# Altium PCB PWM_CONTROLLER_nverter_540VDC_V2.PcbDoc (part 1 of 2)
Units mm, origin at the board's own origin, x right, y up, seen from the top; angles counter-clockwise.
Board outline 210 x 60 mm, 2 copper layers (Top Layer, Bottom Layer), stack 2.071 mm thick; 245 components, 120 nets, 586 pads, 102 vias.
Unrouted connection lines stored in the file: 1.
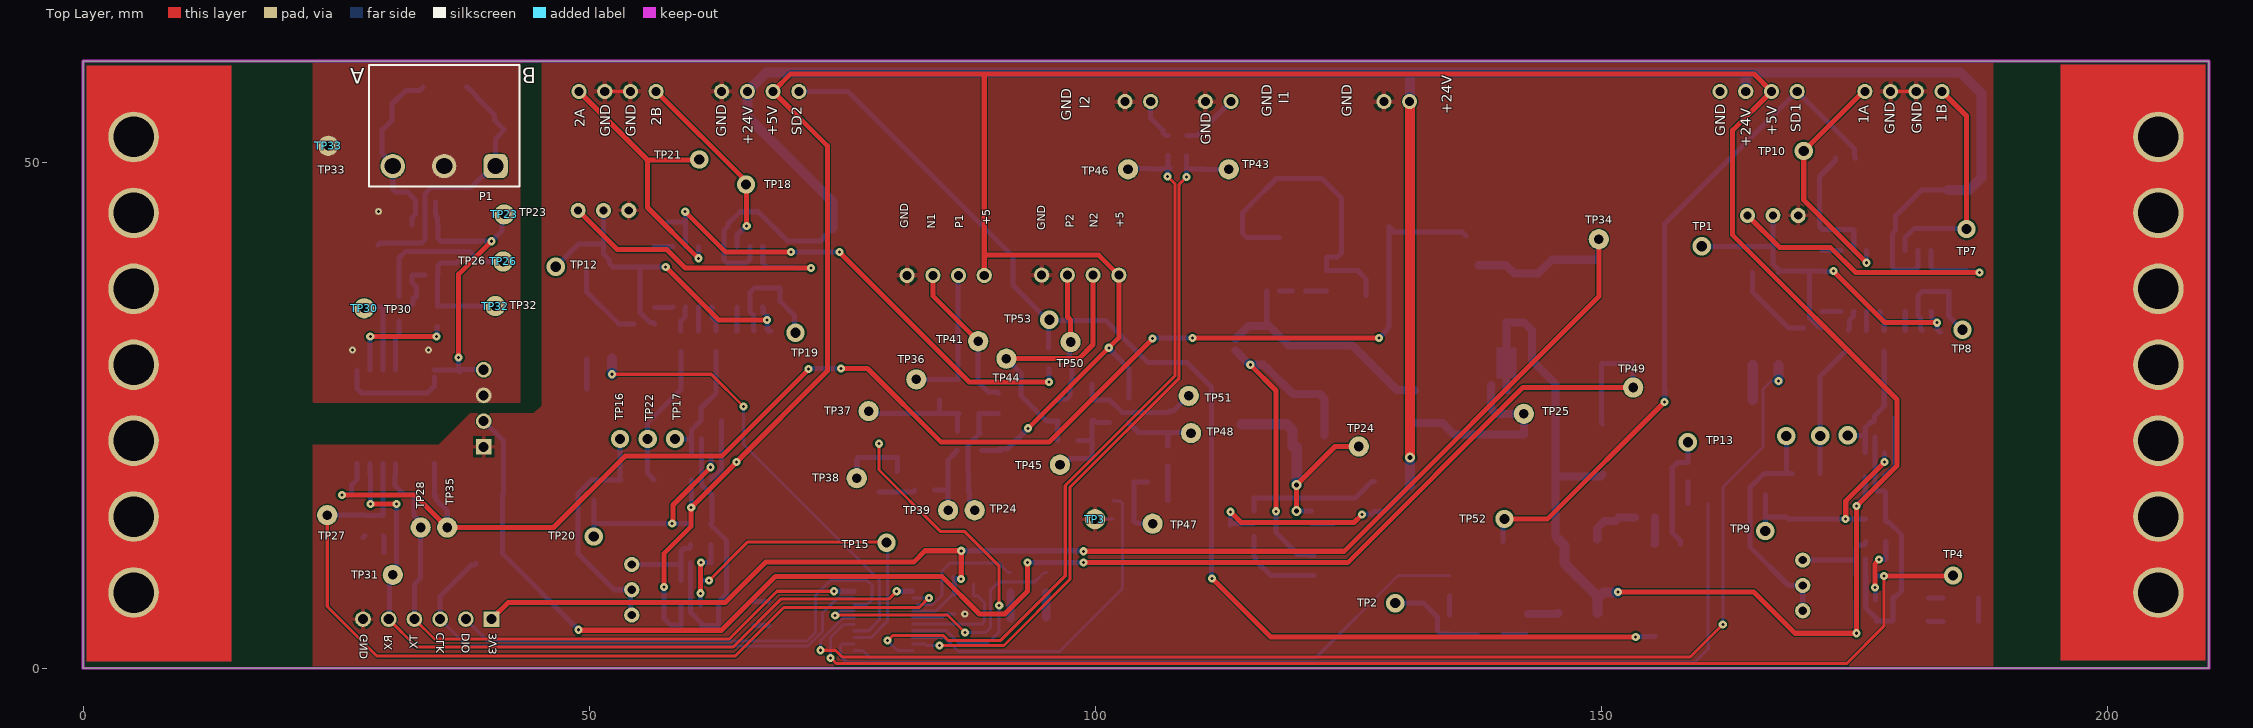
[diagram p0: Top Layer view]
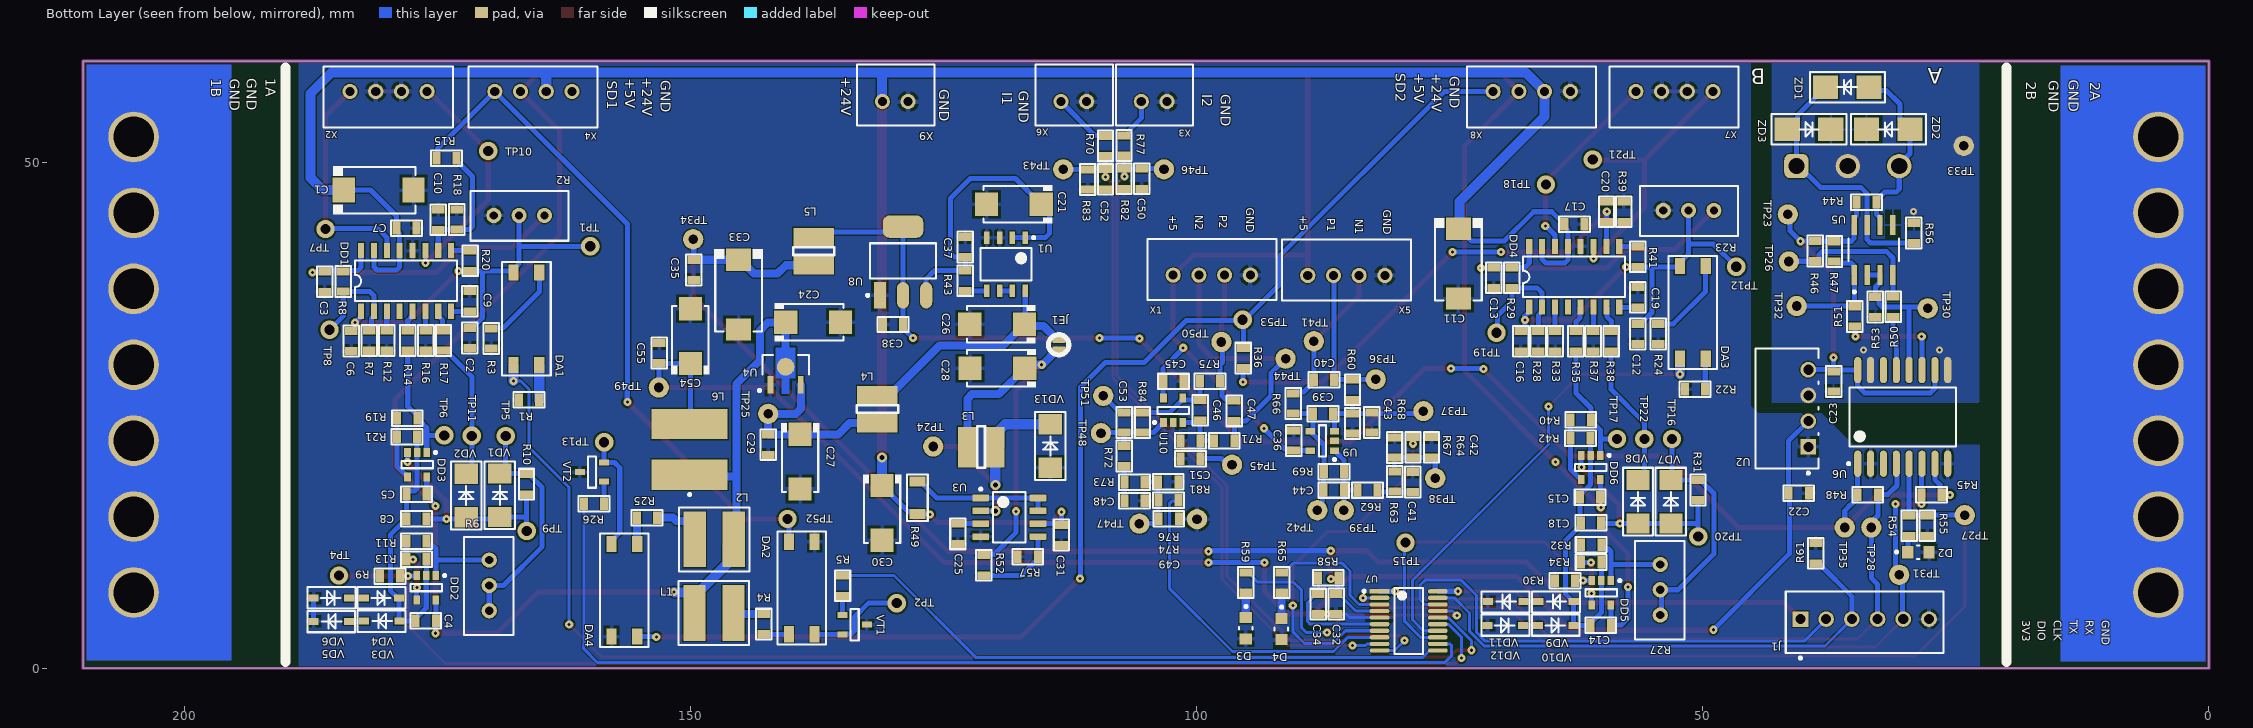
[diagram p1: Bottom Layer view, seen from below]
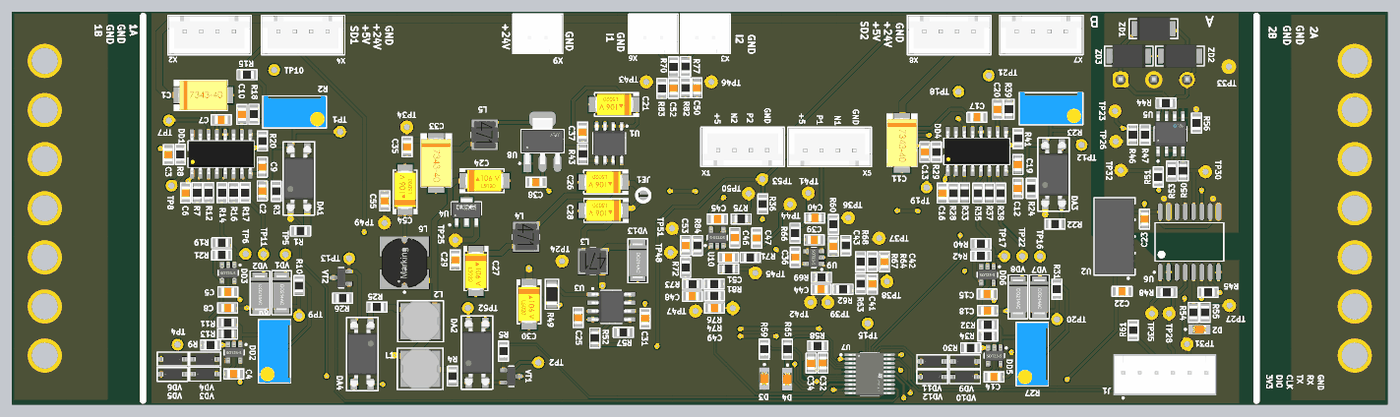
[diagram p3: 3D render of the assembled board from below, using the file's embedded part models]

## Layer stack, top to bottom
Top Solder: solder mask 0.0102, Solder Resist, Dk 3.5
Top Layer: signal copper 0.0356
Dielectric 1: dielectric 2, FR-4, Dk 4.8
Bottom Layer: signal copper 0.0356
Bottom Solder: solder mask 0.0102, Solder Resist, Dk 3.5

## Board outline
0,0 210,0 210,60.002 0,60.002

## Design rules (kind name [scope] priority, off if disabled: settings)
Clearance [All] p1: gap=0.2 ignorepadtopadclearanceinfootprint=TRUE except(0: Region-Hole Text-Hole; 0.1: Track-Track Track-SMDPad Track-THPad Track-Via Track-Fill Track-Poly Track-Region Track-Text Track-Hole SMDPad-SMDPad SMDPad-THPad SMDPad-Via SMDPad-Fill SMDPad-Poly SMDPad-Region SMDPad-Text SMDPad-Hole THPad-THPad THPad-Via THPad-Fill THPad-Poly THPad-Region THPad-Text THPad-Hole; 0.254: Region-Region Region-Text Text-Text)
ComponentClearance [All] p1: gap=-5 collisioncheckmode=3 verticalgap=0.254 showdistances=FALSE
DiffPairsRouting [All] p1: maxlimit=5 minlimit=0.254 mostfreqgap=0.254 toplayer_minwidth=0.381 toplayer_maxwidth=0.381 toplayer_prefwidth=0.381 bottomlayer_minwidth=0.381 bottomlayer_maxwidth=0.381 bottomlayer_prefwidth=0.381 maxuncoupledlength=12.7
Height [All] p1: minheight=0 maxheight=150 prefheight=50
HoleToHoleClearance [All] p1: gap=0 allowstackedmicrovias=TRUE
MinimumSolderMaskSliver [All] p1: minsoldermaskwidth=0
PlaneClearance [All] p1: clearance=0.7
PlaneConnect [All] p1: planeconnectstyle=Relief reliefexpansion=0.2 reliefentries=4 reliefconductorwidth=0.3 reliefairgap=0.1
PolygonConnect [All] p1: connectstyle=Relief reliefconductorwidth=0.254 reliefentries=4 polygonreliefangle="90 Angle" airgapwidth=0.5
RoutingVias [All] p1: holewidth=0.711 width=1.27 viastyle="Through Hole" minholewidth=0.3 minwidth=0.8 maxholewidth=0.711 maxwidth=1.27
SilkToSilkClearance [All] p1: silktosilkclearance=0
SilkToSolderMaskClearance [IsPad] p1: minsilkscreentomaskgap=0 clearancetoexposedcopper=TRUE
SolderMaskExpansion [All] p1: expansion=0.102 istentingtop=FALSE
Width [All] p1: maxlimit=7 minlimit=0.254 preferedwidth=2 minimp=50.000000 maximp=50.000000 favimp=50.000000
21 further rules are at their usual default settings.

## Components (designator, comment, footprint, x,y, rotation, side; value= is the part's Value field where it differs from the comment)
C1 "47uF_16V" CAP-TAN-D 180.796,47.254 r180 bottom
C2 "47uF" CAP-0805 171.8,32.65 r270 bottom
C3 "100nF" CAP-0805 186.121,38.204 r270 bottom
C4 "100nF" CAP-0805 176.149,4.703 r180 bottom
C5 "100nF" CAP-0805 177.049,17.228 r180 bottom
C6 "100nF" CAP-0805 183.496,32.354 r270 bottom
C7 "100nF" CAP-0805 178.046,43.504 r0 bottom
C8 "10nF" CAP-0805 177.074,14.778 r0 bottom
C9 "100nF" CAP-0805 171.796,36.279 r90 bottom
C10 "100nF" CAP-0805 174.896,44.329 r270 bottom
C11 "47uF_16V" CAP-TAN-D 74.134,39.991 r270 bottom
C12 "47uF" CAP-0805 56.434,33.041 r270 bottom
C13 "100nF" CAP-0805 70.639,38.593 r270 bottom
C14 "100nF" CAP-0805 60.075,4.25 r180 bottom
C15 "100nF" CAP-0805 61.125,16.9 r180 bottom
C16 "100nF" CAP-0805 67.964,32.318 r270 bottom
C17 "100nF" CAP-0805 62.689,43.893 r0 bottom
C18 "10nF" CAP-0805 61.05,14.375 r0 bottom
C19 "100nF" CAP-0805 56.439,36.668 r90 bottom
C20 "100nF" CAP-0805 59.514,45.118 r270 bottom
C21 "CAP-POLAR" CAP-TAN-C 118.05,45.85 r0 bottom
C22 "100nF" CAP-0805 40.525,17.3 r0 bottom
C23 "0.47uF" CAP-0805 37.075,28.35 r270 bottom
C24 "CAP-POLAR" CAP-TAN-C 137.875,34.2 r180 bottom
C25 "470pF" CAP-0805 123.575,13.3 r270 bottom
C26 "CAP-POLAR" CAP-TAN-C 119.7,34 r0 bottom
C27 "CAP-POLAR" CAP-TAN-C 139.175,20.425 r270 bottom
C28 "CAP-POLAR" CAP-TAN-C 119.675,29.65 r0 bottom
C29 "0.1uF" CAP-0805 142.325,22.1 r90 bottom
C30 "CAP-POLAR" CAP-TAN-C 131.075,15.375 r270 bottom
C31 "0.47uF" CAP-0805 113.35,13.175 r270 bottom
C32 "0.1uF" CAP-0805 86.2,6.375 r90 bottom
C33 "47uF_16V" CAP-TAN-D 145.25,36.925 r270 bottom
C34 "1uF" CAP-0805 88,6.35 r90 bottom
C35 "0.1uF" CAP-0805 149.675,39.375 r90 bottom
C36 "0.1uF" CAP-0805 90.425,22.525 r270 bottom
C37 "0.1uF" CAP-0805 122.875,41.625 r270 bottom
C38 "0.1uF" CAP-0805 130,33.975 r180 bottom
C39 "0.1uF" CAP-0805 87.525,25.175 r180 bottom
C40 "0.1uF" CAP-0805 87.425,28.525 r180 bottom
C41 "1000pF" CAP-0805 78.65,18.425 r270 bottom
C42 "1000pF" CAP-0805 76.8,21.85 r270 bottom
C43 "0.1uF" CAP-0805 84.6,24.2 r90 bottom
C44 "0.1uF" CAP-0805 86.45,17.625 r180 bottom
C45 "0.1uF" CAP-0805 102.3,28.35 r0 bottom
C46 "0.1uF" CAP-0805 99.65,25.5 r270 bottom
C47 "0.1uF" CAP-0805 96.3,25.45 r270 bottom
C48 "1000pF" CAP-0805 106.125,16.575 r0 bottom
C49 "1000pF" CAP-0805 102.75,14.775 r0 bottom
C50 "22pF" CAP-0805 105.425,48.375 r90 bottom
C51 "0.1uF" CAP-0805 100.6,22.5 r180 bottom
C52 "22pF" CAP-0805 109,48.325 r90 bottom
C53 "0.1uF" CAP-0805 107.15,24.3 r270 bottom
C54 "CAP-POLAR" CAP-TAN-C 150,32.825 r90 bottom
C55 "0.1uF" CAP-0805 153.1,31.15 r270 bottom
D2 "LED" LED_RED 28.7,11.475 r180 bottom
D3 "151031YS06000" LED_RED 95.15,3.975 r270 bottom
D4 "151031YS06000" LED_RED 91.625,3.9 r270 bottom
DA1 "PC817" 4-SMD 166.2,34.55 r90 bottom
DA2 "PC817" 4-SMD 139.005,7.95 r90 bottom
DA3 "PC817" 4-SMD 50.984,35.166 r90 bottom
DA4 "PC817" 4-SMD 156.525,7.725 r270 bottom
DD1 "SG3525" SO16-150 178.071,38.279 r90 bottom
DD2 "MCP6001" SOT-23-5 176.099,7.978 r270 bottom
DD3 "MCP6001" SOT-23-5 176.999,20.128 r270 bottom
DD4 "SG3525" SO16-150 62.684,38.691 r90 bottom
DD5 "MCP6001" SOT-23-5 60.025,7.475 r270 bottom
DD6 "MCP6001" SOT-23-5 61.075,19.85 r270 bottom
J1 "SWR25X-NRTC-S06-ST-BA" Sullins_SWR25X-NRTC-S06-ST-BA_MFG 34.005,4.575 r180 bottom
JE1 "Jumper" JE 113.625,31.975 r180 bottom
L1 "IND-CONST" IND-5852 147.675,5.475 r0 bottom
L2 "IND-CONST" IND-5852 147.65,12.75 r180 bottom
L3 "Coil" Coil_4.5x4.5_mm 121.283,21.875 r0 bottom
L4 "Coil" Coil_4.5x4.5_mm 131.525,25.625 r270 bottom
L5 "Coil" Coil_4.5x4.5_mm 137.825,41.225 r270 bottom
L6 "1000µH, 0.3A" WE-PD2_7850 150.075,21.65 r90 bottom
P1 "691701530003B" 691701530003B 35.675,53.625 r180 top locked
R1 "1K" RES-0805 165.95,26.525 r180 bottom
R2 "3296" 3296W 166.625,46.75 r270 bottom
R3 "10K" RES-0805 169.675,32.6 r90 bottom
R4 "1K" RES-0805 142.75,4.375 r90 bottom
R5 "1K" RES-0805 134.975,8.175 r270 bottom
R6 "3296" 3296W 167.874,7.903 r0 bottom
R7 "10K" RES-0805 181.722,32.379 r270 bottom
R8 "10K" RES-0805 184.296,38.229 r270 bottom
R9 "10K" RES-0805 179.674,9.128 r180 bottom
R10 "1K" RES-0805 166.194,18.203 r270 bottom
R11 "10K" RES-0805 177.074,12.553 r0 bottom
R12 "1K" RES-0805 179.997,32.379 r270 bottom
R13 "10K" RES-0805 177.074,10.803 r180 bottom
R14 "1K" RES-0805 177.921,32.379 r270 bottom
R15 "10K" RES-0805 174.1,50.4 r0 bottom
R16 "4K2" RES-0805 176.146,32.379 r270 bottom
R17 "20" RES-0805 174.396,32.404 r270 bottom
R18 "1K" RES-0805 173.071,44.354 r270 bottom
R19 "10K" RES-0805 177.974,24.728 r0 bottom
R20 "10K" RES-0805 171.772,40.279 r270 bottom
R21 "10K" RES-0805 177.999,22.878 r180 bottom
R22 "1K" RES-0805 50.759,27.591 r180 bottom
R23 "3296W" 3296W 51.109,47.241 r270 bottom
R24 "10K" RES-0805 54.384,33.041 r90 bottom
R25 "1K" RES-0805 154.275,14.9 r180 bottom
R26 "1K" RES-0805 159.525,16.275 r180 bottom
R27 "3296" 3296W 52.2,7.475 r0 bottom
R28 "10K" RES-0805 66.264,32.318 r270 bottom
R29 "10K" RES-0805 68.864,38.593 r270 bottom
R30 "10K" RES-0805 63.625,8.675 r180 bottom
R31 "1K" RES-0805 50.475,17.625 r270 bottom
R32 "10K" RES-0805 61.025,12.225 r0 bottom
R33 "1K" RES-0805 64.564,32.318 r270 bottom
R34 "10K" RES-0805 61.025,10.475 r180 bottom
R35 "1K" RES-0805 62.539,32.318 r270 bottom
R36 "10K" RES-0805 95.375,30.65 r90 bottom
R37 "4K2" RES-0805 60.814,32.318 r270 bottom
R38 "20" RES-0805 59.064,32.318 r270 bottom
R39 "1K" RES-0805 57.789,45.118 r270 bottom
R40 "10K" RES-0805 62.05,24.575 r0 bottom
R41 "10K" RES-0805 56.414,40.668 r270 bottom
R42 "10K" RES-0805 62.075,22.725 r180 bottom
R43 "300K" RES-0805 122.85,38.3 r270 bottom
R44 "10K" RES-0805 33.825,46.05 r0 bottom
R45 "10K" RES-0805 27.4,17.15 r180 bottom
R46 "10K" RES-0805 38.875,41.225 r90 bottom
R47 "10K" RES-0805 37.025,41.2 r90 bottom
R48 "10K" RES-0805 33.7,17.175 r0 bottom locked
R49 "0.33" RES-1206 127.575,16.85 r90 bottom
R50 "100" RES-0805 31.2,35.725 r270 bottom
R51 "100" RES-0805 35,34.775 r270 bottom
R52 "3.8K" RES-0805 121.025,10.2 r270 bottom
R53 "10K" RES-0805 32.95,35.7 r90 bottom
R54 "220" RES-0805 29.625,14.1 r90 bottom
R55 "10K" RES-0805 27.85,14.1 r90 bottom
R56 "10K" RES-0805 29.15,43 r270 bottom
R57 "1.2K" RES-0805 116.675,11.05 r180 bottom
R58 "10K" RES-0805 87,8.975 r0 bottom
R59 "220" RES-0805 95.15,8.475 r270 bottom
R60 "10K" RES-0805 84.6,27.525 r270 bottom
R61 "10K" RES-0805 38.825,11.375 r90 bottom
R62 "10K" RES-0805 83.125,17.625 r0 bottom
R63 "10K" RES-0805 80.425,18.475 r270 bottom
R64 "10K" RES-0805 78.625,21.85 r270 bottom
R65 "220" RES-0805 91.6,8.475 r270 bottom
R66 "10K" RES-0805 90.45,26.175 r270 bottom
R67 "100K*" RES-0805 80.45,21.825 r90 bottom
R68 "10K" RES-0805 82.7,24.3 r90 bottom
R69 "10K" RES-0805 86.425,19.45 r180 bottom
R70 "10K" RES-0805 109,51.625 r270 bottom
R71 "10K" RES-0805 97.275,22.5 r0 bottom
R72 "10K" RES-0805 107.15,20.975 r90 bottom
R73 "10K" RES-0805 106.125,18.4 r0 bottom
R74 "10K" RES-0805 102.775,16.625 r0 bottom
R75 "10K" RES-0805 98.675,28.375 r0 bottom
R76 "100K*" RES-0805 102.8,18.425 r180 bottom
R77 "10K" RES-0805 107.175,51.65 r270 bottom
R81 "10K" RES-0805 100.6,20.725 r180 bottom
R82 "22K" RES-0805 107.175,48.375 r90 bottom
R83 "22K" RES-0805 110.775,48.3 r90 bottom
R84 "10K" RES-0805 105.35,24.3 r270 bottom
TP1 "Test_Point_PCB" Test_Point#1 159.9,41.7 r270 bottom
TP2 "Test_Point_PCB" Test_Point#1 129.625,6.45 r90 bottom
TP3 "Test_Point_PCB" Test_Point#2 99.96,14.75 r180 top
TP4 "Test_Point_PCB" Test_Point#1 184.725,9.175 r270 bottom
TP5 "Test_Point_PCB" Test_Point#1 168.249,22.953 r180 bottom
TP6 "Test_Point_PCB" Test_Point#1 174.324,23.028 r180 bottom
TP7 "Test_Point_PCB" Test_Point#1 186.05,43.4 r90 bottom
TP8 "Test_Point_PCB" Test_Point#1 185.646,33.454 r0 bottom
TP9 "Test_Point_PCB" Test_Point#1 166.173,13.576 r180 bottom
TP10 "Test_Point_PCB" Test_Point#1 169.975,51.125 r90 bottom
TP11 "Test_Point_PCB" Test_Point#1 171.599,22.978 r180 bottom
TP12 "Test_Point_PCB" Test_Point#1 46.7,39.675 r180 bottom
TP13 "Test_Point_PCB" Test_Point#1 158.525,22.35 r180 bottom
TP15 "Test_Point_PCB" Test_Point#1 79.375,12.425 r270 bottom
TP16 "Test_Point_PCB" Test_Point#1 53.05,22.675 r180 bottom
TP17 "Test_Point_PCB" Test_Point#1 58.475,22.675 r180 bottom
TP18 "Test_Point_PCB" Test_Point#1 65.5,47.8 r90 bottom
TP19 "Test_Point_PCB" Test_Point#1 70.366,33.166 r0 bottom
TP20 "Test_Point_PCB" Test_Point#1 50.45,13.025 r180 bottom
TP21 "Test_Point_PCB" Test_Point#1 60.875,50.275 r90 bottom
TP22 "Test_Point_PCB" Test_Point#1 55.775,22.675 r180 bottom
TP23 "Test_Point_PCB" Test_Point#2 41.6,44.85 r0 top
TP24 "Test_Point_PCB" Test_Point#2 126.025,21.925 r90 bottom
TP25 "Test_Point_PCB" Test_Point#2 142.325,25.15 r90 bottom
TP26 "Test_Point_PCB" Test_Point#2 41.5,40.2 r0 top
TP27 "Test_Point_PCB" Test_Point#2 24.125,15.15 r0 bottom
TP28 "Test_Point_PCB" Test_Point#2 33.35,13.925 r0 bottom
TP30 "Test_Point_PCB" Test_Point#2 27.775,35.575 r0 top
TP31 "Test_Point_PCB" Test_Point#2 30.6,9.25 r90 bottom
TP32 "" Test_Point#2 40.725,35.8 r0 top
TP33 "Test_Point_PCB" Test_Point#2 24.225,51.625 r0 top
TP34 "" Test_Point#2 149.731,42.4 r90 bottom
TP35 "Test_Point_PCB" Test_Point#2 35.975,13.925 r0 bottom
TP36 "Test_Point_PCB" Test_Point#3 82.31,28.6 r270 bottom
TP37 "Test_Point_PCB" Test_Point#2 77.6,25.425 r270 bottom
TP38 "Test_Point_PCB" Test_Point#2 76.425,18.8 r270 bottom
TP39 "Test_Point_PCB" Test_Point#2 85.45,15.625 r270 bottom
TP41 "Test_Point_PCB" Test_Point#2 88.425,32.325 r270 bottom
TP42 "Test_Point_PCB" Test_Point#2 88.075,15.625 r270 bottom
TP43 "Test_Point_PCB" Test_Point#2 113.175,49.3 r270 bottom
TP44 "Test_Point_PCB" Test_Point#3 91.21,30.65 r270 bottom
TP45 "Test_Point_PCB" Test_Point#2 96.5,20.125 r0 bottom
TP46 "Test_Point_PCB" Test_Point#2 103.225,49.3 r90 bottom
TP47 "Test_Point_PCB" Test_Point#2 105.65,14.3 r0 bottom
TP48 "Test_Point_PCB" Test_Point#2 109.45,23.25 r0 bottom
TP49 "Test_Point_PCB" Test_Point#2 153.125,27.75 r90 bottom
TP50 "Test_Point_PCB" Test_Point#4 97.55,32.375 r270 bottom
TP51 "Test_Point_PCB" Test_Point#2 109.225,26.925 r0 bottom
TP52 "Test_Point_PCB" Test_Point#1 140.4,14.775 r270 bottom
TP53 "Test_Point_PCB" Test_Point#1 95.45,34.45 r270 bottom
U1 "LP2951-5.0" SOIC-8_L 118.83,39.925 r270 bottom
U2 "B0505S-1W" B0505S-1W 41.675,25.7 r90 bottom
U3 "MC34063" SOIC-8_M 118.5,14.935 r180 bottom
U4 "AMS1117" SOT-89 140.6,29.8 r180 bottom
U5 "MAX485" SOIC-8-MFG 33.125,41.35 r90 bottom locked
U6 "ADUM1401BRWZ" ADI-RW-16_M 30.25,24.85 r90 bottom
U7 "STM32G030F6P6" FP-TSSOP20-YA-IPC_A 79.05,4.7 r180 bottom
U8 "AMS1117-3.3" SOT-223 129,40.25 r180 bottom
U9 "" SOT-23-5 87.575,22.475 r0 bottom
U10 "" SOT-23-5 102.325,25.5 r90 bottom
VD1 "SS16" "DO-214AC, SMA" 168.824,17.103 r270 bottom
VD2 "SS16" "DO-214AC, SMA" 172.149,17.078 r270 bottom
VD3 "1N4148" SOD-123 180.499,4.678 r180 bottom
VD4 "1N4148" SOD-123 180.524,6.953 r0 bottom
VD5 "1N4148" SOD-123 185.474,4.653 r180 bottom
VD6 "1N4148" SOD-123 185.474,6.953 r0 bottom
VD7 "SS16" "DO-214AC, SMA" 53.15,16.475 r270 bottom
VD8 "SS16" "DO-214AC, SMA" 56.4,16.475 r270 bottom
VD9 "1N4148" SOD-123 64.5,6.6 r180 bottom
VD10 "1N4148" SOD-123 64.533,4.256 r0 bottom
VD11 "1N4148" SOD-123 69.475,6.6 r180 bottom
VD12 "1N4148" SOD-123 69.508,4.256 r0 bottom
VD13 "DIODE" "DO-214AC, SMA" 114.45,21.975 r270 bottom
VT1 "BC847" SOT23-3 133.775,4.325 r180 bottom
VT2 "BC847" SOT23-3 159.725,19.4 r0 bottom
X1 "CONN-4-PIN" CONN-PLS-4-2.54mm_1 94.695,38.85 r0 bottom
X2 "CONN-4-PIN" CONN-PLS-4-2.54mm_1 183.625,57 r180 bottom locked
X3 "CONN-2-PIN" XH2- 105.465,56 r180 bottom
X4 "CONN-4-PIN" CONN-PLS-4-2.54mm_1 169.325,57 r180 bottom locked
X5 "CONN-4-PIN" CONN-PLS-4-2.54mm_1 81.405,38.825 r0 bottom
X6 "CONN-2-PIN" XH2- 113.4,56 r180 bottom locked
X7 "CONN-4-PIN" CONN-PLS-4-2.54mm_1 56.615,57 r180 bottom locked
X8 "CONN-4-PIN" CONN-PLS-4-2.54mm_1 70.705,57 r180 bottom locked
X9 "CONN-2-PIN" XH2- 131.04,56 r180 bottom locked
ZD1 "P6SMB16CA" DO-214AA 35.725,57.425 r180 bottom
ZD2 "P6SMB16CA" DO-214AA 31.675,53.25 r180 bottom
ZD3 "P6SMB16CA" DO-214AA 39.5,53.25 r0 bottom

## Footprints (in the part's own frame and the unit in brackets; to place one, negate y for a bottom-side part, rotate by r counter-clockwise, add the part's x,y. Pads: shape width x height; smd on the part's side, far side on the other; paste and mask are expansions set on the pad)
4-SMD [mm]
  rect 1.6x1 smd: 1(-4.575,1.27) 2(-4.575,-1.27) 3(4.575,-1.27) 4(4.575,1.27)
  silkscreen extent -5.6,-2.4 5.6,2.4, body extent -5,-2.29 5,2.29, height 3.85
3296W [mm]
  round 1.5 hole 0.8: 1(2,-2.8) 2(2,-0.3) 3(2,2.2)
  silkscreen extent -0.4,-5.1 4.5,4.6, body extent -0.43,-5.02 4.4,4.52, height 11.55
691701530003B [mm] "THR - 5,08mm - PCB Horizontal Open - 03p"
  rrect50% 2.4x2.4 hole 1.6: 1(-5.08,4)
  round 2.4 hole 1.6: 2(0,4) 3(5.08,4)
  silkscreen extent -7.42,-6 7.42,6, body extent -7.42,-6 7.42,6, height 8.6
ADI-RW-16_M [mm] "SOIC, 16-Leads, Body 10.3x7.5mm, Pitch 1.27mm, IPC Low Density"
  oval 2.6x0.7 smd: 1(-4.625,4.445) 2(-4.625,3.175) 3(-4.625,1.905) 4(-4.625,0.635) 5(-4.625,-0.635) 6(-4.625,-1.905) 7(-4.625,-3.175) 8(-4.625,-4.445) 9(4.625,-4.445) 10(4.625,-3.175) 11(4.625,-1.905) 12(4.625,-0.635) 13(4.625,0.635) 14(4.625,1.905) 15(4.625,3.175) 16(4.625,4.445)
  silkscreen extent -4.75,-5.25 2.93,5.47, body extent -3.8,-5.25 3.8,5.25, height 2.65
B0505S-1W [mm]
  rect 1.55x1.55 hole 1 paste-2539.97 mask+0: 1(-3.81,-2.1)
  round 1.55 hole 1 paste-2539.97 mask+0: 2(-1.27,-2.1) 3(1.27,-2.1) 4(3.81,-2.1)
  silkscreen extent -6.52,-3.13 5.92,3.13, body extent -5.8,-3 5.8,3, height 10.41
CAP-0805 [mm]
  rect 0.8x1.25 smd mask+0.015: 1(-1,0) 2(1,0)
  silkscreen extent -1.52,-0.76 1.52,0.76, body extent -1,-0.62 1,0.63, height 0.8
CAP-TAN-C [mm]
  rect 2.3x2.3 smd: 1(-2.7,0) 2(2.7,0)
  silkscreen extent -3.8,-1.9 3,1.9, body extent -2.9,-1.6 2.9,1.6, height 2.6
CAP-TAN-D [mm]
  rect 2.2x2.5 smd: 1(-3.45,0) 2(3.45,0)
  silkscreen extent -4.5,-2.4 3.65,2.4, body extent -3.8,-2.3 3.8,2.3, height 4
Coil_4.5x4.5_mm [mm]
  rect 1.8x4 smd: 1(-1.397,0) 2(1.397,0)
  silkscreen extent -0.38,-2.03 0.38,2.03, body extent -2.07,-2.07 2.07,2.07, height 2.8
CONN-PLS-4-2.54mm_1 [mm]
  round 1.5 hole 0.9: 1(0,0) 2(2.54,0) 3(5.08,0) 4(7.62,0)
  silkscreen extent -2.6,-3.55 10.15,2.47, body extent -2.45,-3.4 9.95,2.35, height 7
DO-214AA [mm]
  rect 2.5x2.3 smd: 1(-2.15,0) 2(2.15,0)
  silkscreen extent -3.7,-1.5 3.7,1.5, body extent -2.65,-1.81 2.65,1.81, height 2.5
"DO-214AC, SMA" [mm]
  rect 2x2.3 smd: 1(-2.15,0) 2(2.15,0)
  silkscreen extent -3.35,-1.5 3.35,1.5, body extent -2.74,-1.4 2.74,1.4, height 2.24
FP-TSSOP20-YA-IPC_A [mm]
  rect 1.955x0.421 smd paste+0 mask+0: 1(-2.875,2.925)
  rrect100% 1.955x0.421 smd paste+0 mask+0: 2(-2.875,2.275) 3(-2.875,1.625) 4(-2.875,0.975) 5(-2.875,0.325) 6(-2.875,-0.325) 7(-2.875,-0.975) 8(-2.875,-1.625) 9(-2.875,-2.275) 10(-2.875,-2.925) 11(2.875,-2.925) 12(2.875,-2.275) 13(2.875,-1.625) 14(2.875,-0.975) 15(2.875,-0.325) 16(2.875,0.325) 17(2.875,0.975) 18(2.875,1.625) 19(2.875,2.275) 20(2.875,2.925)
  silkscreen extent -4.53,-3.25 1.4,3.25, body extent -3.21,-3.25 3.21,3.25, height 1.2
IND-5852 [mm]
  rect 2.2x5.5 smd: 1(-1.925,0) 2(1.925,0)
  silkscreen extent -3.47,-3.15 3.5,3.15, body extent -3,-3 3,3, height 4.5
JE [mil]
  rect 50x27.56 smd: 1(1,20) 2(1,-21)
  silkscreen extent -39,-39 39,39
LED_RED [mm]
  rect 1.1x1.2 smd paste+0 mask+0: 1(-1.05,0) 2(1.05,0)
  silkscreen extent -2.28,-0.67 0.13,0.67, body extent -1,-0.63 1,0.63, height 0.8
RES-0805 [mm]
  rect 0.8x1.25 smd mask+0.015: 1(-1,0) 2(1,0)
  silkscreen extent -1.52,-0.76 1.52,0.76, body extent -1,-0.62 1,0.63, height 0.6
RES-1206 [mm]
  rect 1x1.6 smd: 1(-1.6,0) 2(1.6,0)
  silkscreen extent -2.29,-1.02 2.29,1.02, body extent -1.6,-0.8 1.6,0.8, height 0.6
SO16-150 [mm]
  rect 1.5x0.6 smd: 1(-3,4.46) 2(-3,3.19) 3(-3,1.92) 4(-3,0.65) 5(-3,-0.62) 6(-3,-1.89) 7(-3,-3.16) 8(-3,-4.43) 9(3,-4.43) 10(3,-3.16) 11(3,-1.89) 12(3,-0.62) 13(3,0.65) 14(3,1.92) 15(3,3.19) 16(3,4.46)
  silkscreen extent -2,-5 2,5.06, body extent -3.07,-4.98 3.07,4.98, height 1.78
SOD-123 [mm]
  rect 1x0.7 smd: 1(-1.75,0) 2(1.75,0)
  silkscreen extent -2.37,-1.08 2.35,1.02, body extent -1.98,-0.85 1.98,0.85, height 1.45
SOIC-8-MFG [mm]
  rect 1.98x0.53 smd paste+0 mask+0: 1(-2.465,1.905) 2(-2.465,0.635) 3(-2.465,-0.635) 4(-2.465,-1.905) 5(2.465,-1.905) 6(2.465,-0.635) 7(2.465,0.635) 8(2.465,1.905)
  silkscreen extent -4.27,-2.5 1.1,2.5, body extent -3,-2.45 3,2.45, height 1.75
SOIC-8_L [mm]
  rrect18% 1.25x0.55 smd: 1(-2.625,1.905) 2(-2.625,0.635) 3(-2.625,-0.635) 4(-2.625,-1.905) 5(2.625,-1.905) 6(2.625,-0.635) 7(2.625,0.635) 8(2.625,1.905)
  silkscreen extent -2.75,-2.5 1.6,2.85, body extent -3,-2.45 3,2.45, height 1.63
SOIC-8_M [mm]
  rrect15% 1.65x0.65 smd: 1(-2.825,1.905) 2(-2.825,0.635) 3(-2.825,-0.635) 4(-2.825,-1.905) 5(2.825,-1.905) 6(2.825,-0.635) 7(2.825,0.635) 8(2.825,1.905)
  silkscreen extent -2.95,-2.5 1.6,2.9, body extent -3,-2.45 3,2.45, height 1.63
SOT23-3 [mm]
  rect 1x0.6 smd: 1(-1.2,0.95) 2(-1.2,-0.95) 3(1.2,0)
  silkscreen extent -0.4,-1.55 0.4,1.55, body extent -1.25,-1.46 1.23,1.46, height 1.02
SOT-23-5 [mm]
  rect 0.9x0.65 smd: 1(-1.2,0.95) 2(-1.2,0) 3(-1.2,-0.95) 4(1.2,-0.95) 5(1.2,0.95)
  silkscreen extent -1.32,-1.55 0.35,1.95, body extent -1.4,-1.45 1.4,1.45, height 1.24
SOT-89 [mm]
  rect 0.58x1.73 smd paste+0 mask+0: 1(-1.5,-1.781) 3(1.5,-1.781)
  round 1.74 smd paste+0 mask+0: 2(0,0)
  Top Layer region: -0.38,-2.646 -0.38,-1.146 -0.967,-1.146 -0.967,1.884 0.967,1.884 0.967,-1.146 0.38,-1.146 0.38,-2.646
  silkscreen extent -2.7,-2.47 2.3,1.15, body extent -2.25,-2.42 2.25,1.68, height 1.6
SOT-223 [mm]
  rect 1.2x2.6 smd paste+0 mask+0: 1(-2.29,-3.395)
  rrect100% 1.2x2.6 smd paste+0 mask+0: 2(0,-3.395) 3(2.29,-3.395)
  rrect59% 4x2.2 smd paste+0 mask+0: 2(0,3.395)
  silkscreen extent -3.63,-3.52 3.25,1.75, body extent -3.25,-3.53 3.25,3.53, height 1.8
Sullins_SWR25X-NRTC-S06-ST-BA_MFG [mm]
  rect 1.55x1.55 hole 1 paste-2539.97 mask+0: 1(-6.35,0.3)
  round 1.55 hole 1 paste-2539.97 mask+0: 2(-3.81,0.3) 3(-1.27,0.3) 4(1.27,0.3) 5(3.81,0.3) 6(6.35,0.3)
  silkscreen extent -7.8,-3.67 7.8,3.05, body extent -7.65,-2.9 7.65,2.9, height 11.7
Test_Point#1 [mm]
  round 1.8 hole 1 paste-2539.97 mask+0.102: 1(0,0)
Test_Point#2 [mm]
  round 2 hole 0.95: 1(0,0)
Test_Point#3 [mm]
  round 2 hole 0.95: 1(0.05,0)
Test_Point#4 [mm]
  round 2 hole 0.95: 1(0.125,0)
WE-PD2_7850 [mm] "SMD Power Inductor, 2-Leads, body 7.8x7mm"
  rect 3x7.5 smd: 1(-2.5,0) 2(2.5,0)
  silkscreen extent -4.59,-0.12 -4.34,0.13, body extent -3.81,-3.5 3.81,3.5, height 4.95
XH2- [mm]
  round 1.5 hole 0.9: 1(0,0) 2(2.54,0)
  silkscreen extent -2.5,-2.35 5.13,3.65, body extent -2.4,-2.25 5,3.55, height 7

## Part data
C1 C11 C33: library part CAP-POLAR
C2 C3 C4 C5 C6 C7 C8 C9 C10 C12 C13 C14 C15 C16 C17 C18 C19 C20 C22 C23 C25 C29 C31 C32 C34 C35 C36 C37 C38 C39 C40 C41 C42 C43 C44 C45 C46 C47 C48 C49 C50 C51 C52 C53 C55: library part CAP-NON-POLAR
D2: "WURTH ELEKTRONIK - 151031YS06000 - LED, Yellow, Through Hole, T-1 (3mm), 30 mA, 2 V, 590 nm", Manufacturer_Name="Wurth Elektronik", Manufacturer_Part_Number=151031YS06000, Mouser Part Number=710-151031YS06000, Datasheet Link=https://katalog.we-online.de/led/datasheet/151031YS06000.pdf, Geometry.Height=5.5mm, Mouser Price/Stock=https://www.mouser.co.uk/ProductDetail/Wurth-Elektronik/151031YS06000?qs=LlUlMxKIyB3xSYYW%252BcuBiQ%3D%3D
D3 D4: library part LED, "WURTH ELEKTRONIK - 151031YS06000 - LED, Yellow, Through Hole, T-1 (3mm), 30 mA, 2 V, 590 nm", Manufacturer_Name="Wurth Elektronik", Mouser Part Number=710-151031YS06000, Datasheet Link=https://katalog.we-online.de/led/datasheet/151031YS06000.pdf, Geometry.Height=5.5mm, Manufacturer_Part_Number=151031YS06000, Mouser Price/Stock=https://www.mouser.co.uk/ProductDetail/Wurth-Elektronik/151031YS06000?qs=LlUlMxKIyB3xSYYW%252BcuBiQ%3D%3D
JE1: library part JE
L6: library part 74477530, "WE-PD2 SMT Power Inductor, size 7850, 1000µH, 0.3A, 3.3Ω", Case/Size Code=7850, DC Resistance=2.78Ω, DC Resistance Max=3.3Ω, Inductance=1000µH, Manufacturer="Wurth Elektronik", Operating Temperature Max=125°C, Operating Temperature Min=-40°C, Rated Current=0.3A, Self Resonant Frequency=2.4MHz, Category="Unshielded Power Inductors", ComponentLink1Description="Website Link", ComponentLink1URL=https://www.we-online.com/redexpert/article/74477530?ad, ComponentLink2Description="Datasheet Link", ComponentLink2URL=https://www.we-online.com/redexpert/spec/74477530?ad, Height=4.95mm, Length=7.8mm, Manufacturer Part Number=74477530, Match Code=WE-PD2, Mount="Surface Mount", Packaging="Tape and Reel", Saturation Current=0.3A, Width=7mm, Simulation ModelName=7850_74477530_1m, Simulation ModelText="******* / .subckt 7850_74477530_1m 1 2 / Rp 1 2 187304.915771 / Cp 1 2 4.36976277949p / Rs 1 N3 3.3 / L1 N3 2 1000u / .ends 7850_74477530_1m", Simulation PortMap=(1:1),(2:2)
P1: "WR-TBL Series 7015B Open Horizontal PCB Header, SMT, pitch 5.08mm, 3p", Manufacturer="Wurth Elektronik", Operating Temperature Max=105°C, Operating Temperature Min=-40°C, Rated Current=10A, Working Voltage=300V, Application=Pluggable, Category="Terminal Blocks", ComponentLink1Description="Website Link", ComponentLink1URL=https://www.we-online.com/redexpert/article/691701530003B?ad, ComponentLink2Description="Datasheet Link", ComponentLink2URL=https://www.we-online.com/redexpert/spec/691701530003B?ad, Manufacturer Part Number=691701530003B, Match Code=WR-TBL, Modularity=No, Mount="Surface Mount", Number of Pins=3, Number of Rows=1, Orientation=Horizontal, Packaging=Box, Pitch=5.08mm
R1 R22 R52: library part RES-CONST, "10K"
R3 R4 R5 R7 R8 R9 R10 R11 R12 R13 R14 R15 R16 R18 R19 R20 R21 R24 R25 R26 R28 R29 R30 R31 R32 R33 R34 R35 R36 R37 R39 R40 R41 R42 R43 R44 R45 R46 R47 R48 R49 R50 R51 R53 R54 R55 R56 R57 R58 R59 R60 R61 R62 R63 R64 R65 R66 R67 R68 R69 R70 R71 R72 R73 R74 R75 R76 R77 R81 R82 R83 R84: library part RES-CONST
R17 R38: library part RES-CONST, "1K"
TP1 TP2 TP3 TP4 TP5 TP6 TP7 TP8 TP9 TP10 TP11 TP12 TP13 TP15 TP16 TP17 TP18 TP19 TP20 TP21 TP22 TP23 TP24 TP25 TP26 TP27 TP28 TP30 TP31 TP32 TP33 TP34 TP35 TP36 TP37 TP38 TP39 TP41 TP42 TP43 TP44 TP45 TP46 TP47 TP48 TP49 TP50 TP51 TP52 TP53: library part TP_PCB?, "Test_Point"
U1: library part LP2951-3.3
U6: library part CMP-0534-00565-1, "Quad Channel Digital Isolator, 2.5 KV rms Insulation Rating, 10 Mbps Data Rate, 50 ns Delay, Industrial, 16-pin SOIC (RW-16), Tube", Manufacturer="Analog Devices", Max Operating Temp (degreesC)=125, Code_JEDEC=MS-013-AA, ComponentLink1Description="Manufacturer URL", ComponentLink1URL=http://www.analog.com/en/index.html, ComponentLink2Description=Datasheet, ComponentLink2URL=http://www.analog.com/static/imported-files/data_sheets/ADuM1400_1401_1402.pdf, ComponentLink3Description="Package Specification", ComponentLink3URL=http://www.analog.com/static/imported-files/packages/PKG_PDF/SOIC_WIDE%20%28RW%29/RW_16.pdf, ComponentLink4Description="URL Link1", ComponentLink4URL="Product URL:http://www.analog.com/en/interface-isolation/digital-isolators/adum1401/products/product.html", ComponentLink5Description="URL Link2", ComponentLink5URL="Reference Circuit:http://www.analog.com/en/interface-isolation/digital-isolators/adum1401/products/product.html#product-recommendations", DatasheetVersion="Rev. H", Max Data Rate=10Mbps, Mounting Technology="Surface Mount", PackageDescription="16-Pin Standard Small Outline Package, Body 10.3 x 7.5 mm, Pitch 1.27 mm", PackageReference=RW-16, PackageVersion="032707-B, 03/2007", PartNumber=ADUM1401BRWZ
U7: "SOIC-20"
U8: library part AMS1117
U9 U10: library part MCP6001T, "IC OPAMP GP 1 CIRCUIT SOT23-5", Case/Package=SOT-23, Input Bias Current=1pA, Input Offset Voltage (Vos)=4.5mV, Max Operating Temperature=85°C, Max Supply Voltage=6V, Min Operating Temperature=-40°C, Min Supply Voltage=1.8V, Nominal Supply Current=100uA, Operating Supply Voltage=5.5V, Output Current=23mA, Package Quantity=1, Power Supply Rejection Ratio (PSRR)=86dB, Voltage Gain=112dB, Bandwidth=1MHz, Common Mode Rejection Ratio=60dB, Contact Plating=Tin, Gain Bandwidth Product=1MHz, Height=1.3mm, Lead Free="Lead Free", Length=3.1mm, Mount="Surface Mount", Number of Amplifiers=1, Number of Channels=1, Number of Circuits=1, Number of Elements=1, Number of Pins=5, Operating Supply Current=100uA, Output Current per Channel=23mA, Packaging="Tape and Reel", Radiation Hardening=No, REACH SVHC="No SVHC", Slew Rate=0.6V/µs, Unity Gain Bandwidth Product=1MHz, Voltage=6V, Width=1.8mm
VD1 VD2 VD3 VD4 VD5 VD6 VD7 VD8 VD9 VD10 VD11 VD12: library part DIODE
VT1 VT2: library part BIPOLAR-NPN-BEC

## Free pads (board coordinates)
  round 5 hole 4: 6(5,7.5) 6(5,15) 6(5,22.5) 6(5,30) 6(5,37.5) 6(5,45) 6(5,52.5) 6(205,7.5) 6(205,15) 6(205,22.5) 6(205,30) 6(205,37.5) 6(205,45) 6(205,52.5)

## Via types
v1: diameter 0.8, hole 0.3, Top Layer to Bottom Layer, 73 vias
v2: diameter 1.8, hole 1, Top Layer to Bottom Layer, 22 vias
v3: diameter 0.7, hole 0.3, Top Layer to Bottom Layer, 4 vias
v4: diameter 1, hole 0.5, Top Layer to Bottom Layer, 3 vias

## Nets (pads, with @x,y where several pads share a name; then routed paths per layer and width w, separated by ;. In a path a pad name is that pad's centre, name@x,y a point inside that pad or via, vN(x,y) a via of type N, cw(c..) or ccw(c..) an arc to the next point about the centre after c; other vN are vias at no path point)
+3V3: C38.2 L5.1 R45.2 R48.2 TP35.1 U6.1 U6.7 U8.2 | length 148.5
  Top Layer w0.5: v1(25.575,17.15) 32.75,17.15 TP35.1@35.975,13.925 46.475,13.925 53.525,20.975 63.1,20.975 71.675,29.55 v1(71.675,29.6) ; v1(74.875,29.625) 77.5,29.625 84.775,22.35 95.425,22.35 v1(105.65,32.575) ; v1(109.575,32.625) v1(128,32.625)
  Bottom Layer w0.5: v1(25.575,17.15) R45.2@26.4,17.15 26.53,17.281 26.53,18.105 27.075,18.65 U6.7@27.075,20.225 ; U6.1@34.695,20.225 34.7,20.22 R48.2@34.7,17.175 ; 35.493,16.107 35.55,16.05 ; TP35.1@35.975,13.925 35.975,15.575 34.85,16.7 R48.2@34.85,16.8 ; v1(71.675,29.6) 71.7,29.625 v1(74.875,29.625) ; v1(105.65,32.575) 105.7,32.625 v1(109.575,32.625) ; v1(128,32.625) 128.85,33.475 128.85,33.6 129,33.75 U8.2@129,36.855 U8.2@129,43.645 129.545,43.1 136.247,43.1 L5.1@136.622,42.725 ; R48.2@34.7,17.175 34.7,16.95 R48.2@34.85,16.8 ; R48.2@34.7,17.175 34.85,17.025 R48.2@34.85,16.8
+3V3_MCU: C32.2 C33.1 C35.2 J1.1 L5.2 R58.1 TP34.1 U7.4 | length 152.6
  Top Layer w0.5: J1.1@40.355,4.875 42.005,6.525 63.45,6.525 67.425,10.5 82.05,10.5 83.175,11.625 v1(86.75,11.625) 86.75,8.875 v1(86.725,8.85) ; v1(98.825,11.575) 124.575,11.575 149.731,36.731 TP34.1@149.731,42.4
  Bottom Layer w0.3: U7.4@81.925,5.675 84.275,5.675 85.975,7.375 C32.2@86.1,7.375
  Bottom Layer w0.5: R58.1@86,8.975 86.067,8.907 86.668,8.907 v1(86.725,8.85) ; C32.2@86.1,7.375 R58.1@86.1,8.6 ; v1(86.75,11.625) 98.775,11.625 v1(98.825,11.575) ; C35.2@149.264,40.375 C35.2@149.414,40.225 ; C35.2@149.675,40.375 149.675,42.344 TP34.1@149.731,42.4
  Bottom Layer w0.8: L5.2@137.825,39.828 140.572,39.828 141.4,39 143.725,39 145.1,40.375 C33.1@145.25,40.375 C35.2@149.264,40.375
+5: C4.2 C5.2 C14.2 C15.2 C24.1 C36.2 C45.2 DD2.5 DD3.5 DD5.5 DD6.5 L1.2 L2.2 L6.1 U4.2 U9.5 U10.5 X1.4 X4.2 X5.4 X8.2 | length 373.7
  Top Layer w0.5: v1(57.4,8.05) 57.4,11.375 60.075,14.05 v1(60.075,15.9) 64.425,20.25 64.55,20.375 v1(64.55,20.4) 73.525,29.375 73.525,51.64 X8.2@68.165,57 69.9,58.735 88.987,58.735 ; X5.4@89.025,38.825 89.025,40.825 ; v1(93.35,23.725) 93.375,23.725 102.315,32.665 X1.4@102.315,38.85 100.34,40.825 89.025,40.825 ; v1(151.625,7.55) 165.025,7.55 169.097,3.478 v1(175.174,3.478) 175.199,3.503 v1(175.199,16.053) 179.175,20.029 179.175,26.575 162.95,42.8 162.95,53.165 X4.2@166.785,57 165.05,58.735 128.614,58.735 88.987,58.735 ; 88.987,58.735 89.025,58.697 89.025,40.825
  Bottom Layer w0.5: v1(57.4,8.05) 57.4,4.925 58.044,4.281 58.925,4.281 58.956,4.25 C14.2@59.075,4.25 DD5.5@59.075,6.275 ; v1(60.075,15.9) 60.1,15.925 60.1,16.65 60.125,16.675 C15.2@60.125,16.9 DD6.5@60.125,18.65 ; U9.5@88.775,21.525 C36.2@90.65,21.525 ; C36.2@90.425,21.525 90.575,21.675 91.325,21.675 v1@93.35,23.7 ; v1@101.3,31.65 103.3,29.65 C45.2@103.3,28.35 103.3,26.725 U10.5@103.275,26.7 ; DD2.5@175.149,6.778 C4.2@175.149,4.703 175.161,4.69 175.161,3.49 v1(175.174,3.478) ; v1(175.199,16.053) 175.256,16.11 175.256,16.21 176.049,17.003 C5.2@176.049,17.228 DD3.5@176.049,18.928
  Bottom Layer w0.8: C24.1@140.575,34.2 C24.1@140.6,34.175 ; U4.2@140.6,29.8 C24.1@140.6,34.175 ; 145.45,18.969 145.45,13.025 L2.2@145.725,12.75 ; L6.1@150.075,19.15 149.894,18.969 145.456,18.969 145.456,28.119 143.125,30.45 143.125,33.4 142.362,34.162 140.613,34.162 C24.1@140.6,34.175
  Bottom Layer w1: L2.2@145.725,12.75 146.325,12.15 146.325,10.4 149.6,7.125 L1.2@149.6,5.475 149.6,6.886 150.2,7.486 151.561,7.486 v1(151.625,7.55)
  other v1: 101.325,31.675
+5V_1: C21.1 C37.2 R43.1 U1.1 U1.2 U8.3 | length 32.1
  Bottom Layer w0.5: U1.2@118.195,42.55 U1.1@116.925,42.55 114.95,42.55 114.55,42.95 114.55,45.05 C21.1@115.35,45.85 117.9,48.4 122.35,48.4 124.325,46.425 124.325,41.05 123.93,40.655 122.905,40.655 122.85,40.6 R43.1@122.85,39.3 125.9,39.3 126.71,38.49 U8.3@126.71,36.855
+5V_ISO: C23.1 R44.2 R46.2 R47.2 TP23.1 U2.4 U5.8 U6.10 U6.16 | length 42.6
  Top Layer w0.5: v1(37.1,30.7) 37.1,38.95 v1(40.35,42.2)
  Bottom Layer w0.5: U6.10@27.075,29.475 27.075,27.65 27.525,27.2 34,27.2 34.7,27.9 U6.16@34.7,28.8 ; U6.16@34.695,29.475 36.95,29.475 C23.1@37.075,29.35 ; R44.2@34.825,46.05 34.825,44.745 35.03,44.54 U5.8@35.03,43.815 35.045,43.8 35.045,42.493 35.338,42.2 R47.2@37.025,42.2 38.85,42.2 38.863,42.212 39.25,42.212 40.338,42.212 v1(40.35,42.2) ; v1(37.1,30.7) 37.075,30.675 C23.1@37.075,29.35 ; R46.2@38.875,42.225 R46.2@39.25,42.225 ; U2.4@39.575,29.51 37.46,29.51 37.3,29.35 C23.1@37.075,29.35 ; v1@40.375,42.225 41.386,43.236 41.386,44.636 TP23.1@41.6,44.85
+5V_RS: C22.2 C54.1 C55.2 L6.2 TP49.1 U2.2 | length 155
  Top Layer w0.5: v1(48.95,3.825) 49,3.775 63.075,3.775 68.4,9.1 84.825,9.1 88.55,5.375 91.05,5.375 93.3,7.625 v1(93.3,10.45) ; v1(98.825,10.475) 98.85,10.45 124.925,10.45 142.225,27.75 TP49.1@153.125,27.75
  Bottom Layer w0.5: U2.2@39.575,24.43 41.525,22.48 C22.2@41.525,17.3 41.45,17.225 41.45,11.325 v1(48.95,3.825) ; v1(93.3,10.45) 98.8,10.45 v1(98.825,10.475) ; L6.2@150.075,24.15 150,24.225 C54.1@150,30.125 153.075,30.125 C55.2@153.1,30.15 153.125,30.125 TP49.1@153.125,27.75
+24V: C1.1 C7.2 C11.1 C17.2 C30.1 C31.1 DD1.13 DD1.15 DD4.13 DD4.15 R49.1 U3.6 X4.3 X8.3 X9.1 | length 254.9
  Top Layer w0.5: v1(113.35,15.475) 114.4,14.425 125.55,14.425 v1(126.35,15.225)
  Top Layer w1: v4(131.075,20.825) X9.1@131.075,55.65
  Bottom Layer w0.5: DD4.15@65.874,41.691 65.874,40.412 65.506,40.043 63.627,40.043 63.334,40.336 DD4.13@63.334,41.691 63.334,43.313 63.689,43.668 C17.2@63.689,43.893 64.911,45.116 66.709,45.116 69.609,42.216 72.841,42.216 73.134,42.508 73.134,42.591 C11.1@73.984,43.441 ; v1(113.35,15.475) C31.1@113.35,14.175 113.475,14.3 U3.6@115.675,14.3 ; v1(126.35,15.225) 126.363,15.237 127.263,15.237 127.525,15.5 128.5,15.5 C30.1@131.075,18.075 ; 131.025,58.875 131.075,58.825 ; DD1.15@181.261,41.279 181.261,39.646 180.969,39.354 179.014,39.354 178.721,39.646 DD1.13@178.721,41.279 178.721,42.953 179.046,43.278 C7.2@179.046,43.503 179.046,44.704 181.596,47.254 C1.1@184.246,47.254
  Bottom Layer w0.8: 164.245,58.406 164.614,58.775
  Bottom Layer w1: C11.1@74.041,43.533 74.041,46.109 65.625,54.525 X8.3@65.625,57 67.5,58.875 131.025,58.875 164.245,58.875 185.45,58.875 187.525,56.8 187.525,48.475 186.304,47.254 C1.1@184.246,47.254 ; C30.1@131.075,18.075 v4(131.075,20.825) ; X9.1@131.075,56.065 131.075,58.825 ; X4.3@164.245,57 164.245,58.406 ; 164.245,58.775 164.614,58.775
GND_2: C23.2 P1.2 R53.1 R56.1 TP33.1 U2.3 U5.5 U6.9 U6.15 ZD2.1 ZD3.1
  other v3: 26.625,31.45 34.125,31.475 29.2,45.125
GND_III: C1.2 C2.2 C3.2 C6.2 C7.1 C9.2 C10.1 C11.2 C12.2 C13.2 C16.2 C17.1 C19.2 C20.1 C21.2 C22.1 C24.2 C25.2 C26.2 C27.2 C28.2 C29.1 C30.2 C31.2 C32.1 C33.2 C34.1 C35.1 C36.1 C37.1 C38.1 C41.1 C42.1 C43.1 C45.1 C48.1 C49.1 C50.1 C51.1 C52.1 C54.2 C55.1 D2.2 D3.2 D4.2 DA2.3 DA4.3 DD1.12 DD4.12 J1.6 R1.1 R2.1 R3.1 R7.2 R9.1 R12.2 R16.2 R18.1 R22.1 R23.1 R24.1 R28.2 R30.1 R33.2 R37.2 R39.1 R55.1 R57.1 R61.2 R67.2 R68.1 R76.2 R81.1 R82.1 R83.1 TP3.1 U1.3 U1.4 U2.1 U3.4 U4.1 U6.2 U6.8 U7.5 U8.1 U9.2 U10.2 VD5.1 VD6.2 VD11.1 VD12.2 VD13.2 VT1.3 VT2.3 X1.1 X2.2 X2.3 X3.2 X5.1 X6.2 X7.2 X7.3 X8.4 X9.2 | length 13.9
  Top Layer w0.3: X7.3@51.535,57 X7.2@54.075,57 ; X2.3@178.545,57 X2.2@181.085,57
  Bottom Layer w0.3: U7.5@81.925,5.025 84.875,5.025 85.225,5.375 C32.1@86.2,5.375 ; TP3.1@99.96,14.75 99.985,14.775 C49.1@101.75,14.775
  Bottom Layer w0.5: R55.1@27.65,12.95 27.8,13.1 R55.1@27.85,13.1 ; VD5.1@187.224,4.653 VD6.2@187.224,6.953
  other v3: 87.1,5.375
NetC2_1: C2.1 C6.1 DA1.4 DD1.1 R2.2 R20.2 TP1.1 | length 41.1
  Top Layer w0.5: v1(172.896,39.254) 177.996,34.154 v1(183.121,34.154)
  Bottom Layer w0.5: TP1.1@159.168,41.693 166.925,41.693 ; R2.2@166.925,44.75 166.925,41.693 ; DA1.4@167.47,39.125 167.624,39.279 170.532,39.279 ; DA1.4@167.47,39.405 167.47,39.425 167.22,39.675 167.218,39.675 166.925,39.968 166.925,41.693 ; C2.1@171.8,33.65 171.65,33.8 171.375,33.8 170.532,34.643 170.532,39.279 ; v1(172.896,39.254) 172.871,39.229 171.821,39.229 R20.2@171.771,39.279 170.532,39.279 ; DD1.1@182.531,35.279 182.581,35.229 182.581,34.694 v1(183.121,34.154) ; C6.1@183.461,33.221 183.179,33.504 183.179,34.096 v1(183.121,34.154) ; C6.1@183.479,33.221 183.404,33.221 183.121,33.504 v1(183.121,34.154)
  other v2: 159.9,41.7
NetC3_1: C3.1 DD1.16 R2.3 R8.1 | length 32
  Top Layer w0.5: R2.3@164.425,44.75 167.575,41.6 172.6,41.6 175.075,39.125 v1(187.35,39.125)
  Bottom Layer w0.5: DD1.16@182.531,41.279 182.531,39.621 182.824,39.329 185.996,39.329 C3.1@186.121,39.204 186.2,39.125 186.239,39.164 187.311,39.164 v1(187.35,39.125)
NetC4_1: C4.1 C5.1 C8.2 DD2.2 DD3.2 R13.2 R21.2 VD3.2 VD4.1 | length 28.6
  Bottom Layer w0.5: R13.2@176.074,10.803 176.074,9.203 DD2.2@176.099,9.178 176.099,5.978 C4.1@177.149,4.928 ; C4.1@176.999,5.078 C4.1@177.149,4.928 ; R21.2@176.999,22.878 DD3.2@176.999,21.328 176.999,17.778 177.256,17.52 177.899,17.52 178.049,17.37 C5.1@178.049,17.228 C8.2@178.049,14.793 ; C8.2@178.074,14.777 178.074,14.552 178.224,14.402 178.449,14.402 179.649,13.202 179.649,7.678 179.024,7.053 178.874,7.053 VD4.1@178.774,6.953 178.774,4.703 VD3.2@178.749,4.678 177.174,4.678 C4.1@177.149,4.703 C4.1@177.149,4.928